# Altium PCB NFC_Lugg_Tag_PCB.PcbDoc
Units mm, origin at the board's own origin, x right, y up, seen from the top; angles counter-clockwise.
Board outline 100.08 x 50.16 mm, 2 copper layers (Top Layer, Bottom Layer), stack 1.671 mm thick; 42 components, 31 nets, 168 pads, 35 vias.
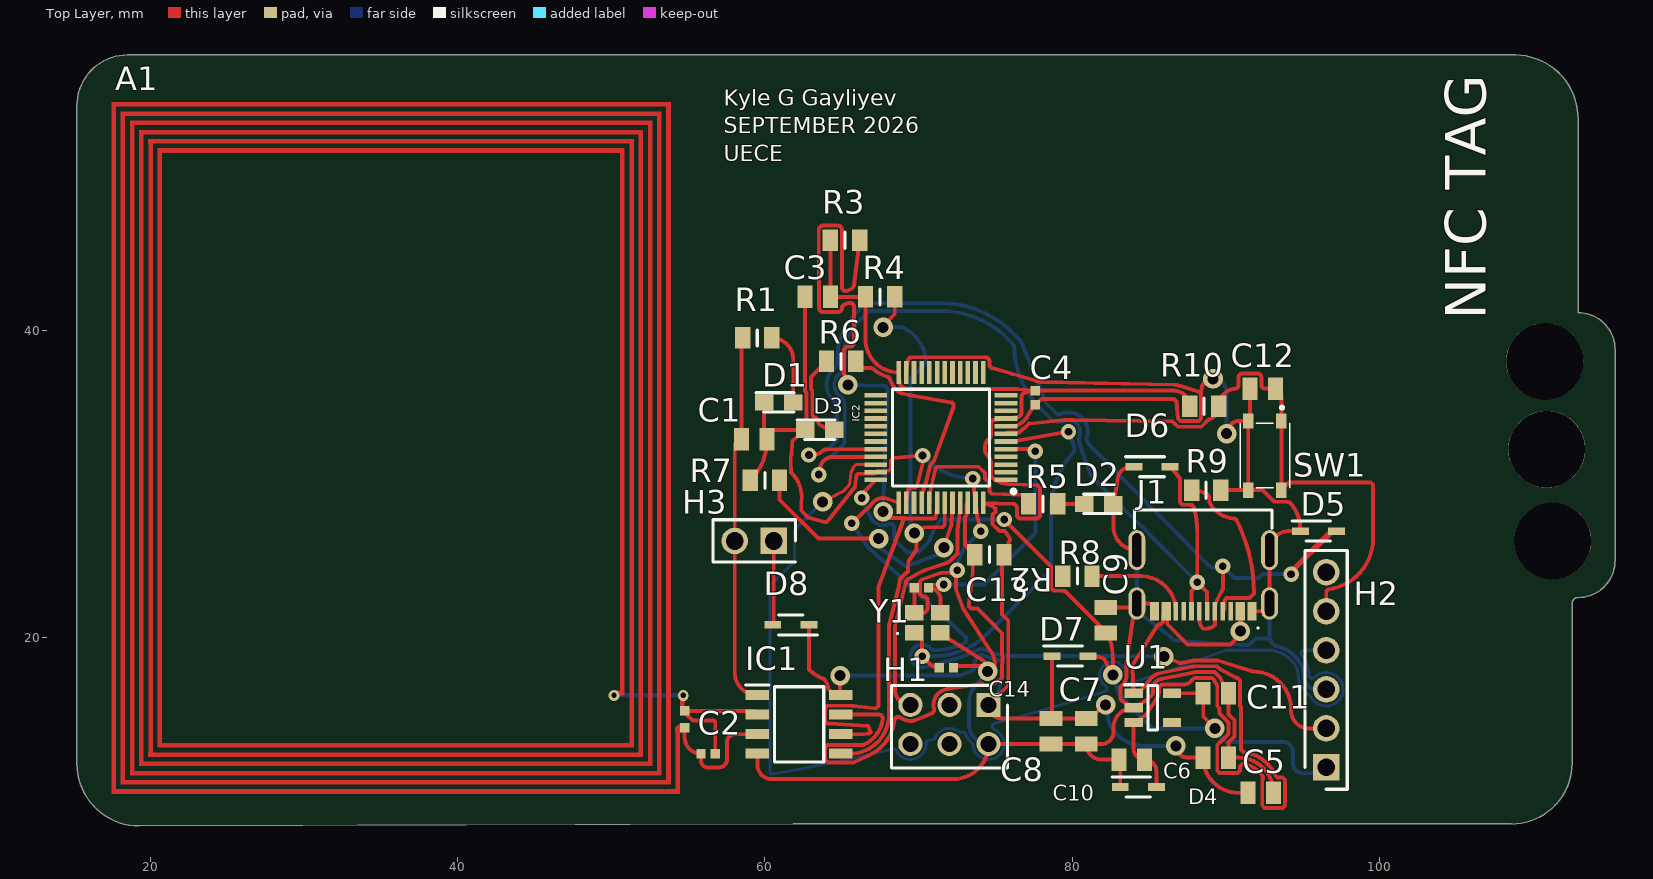
[diagram p0: Top Layer view]
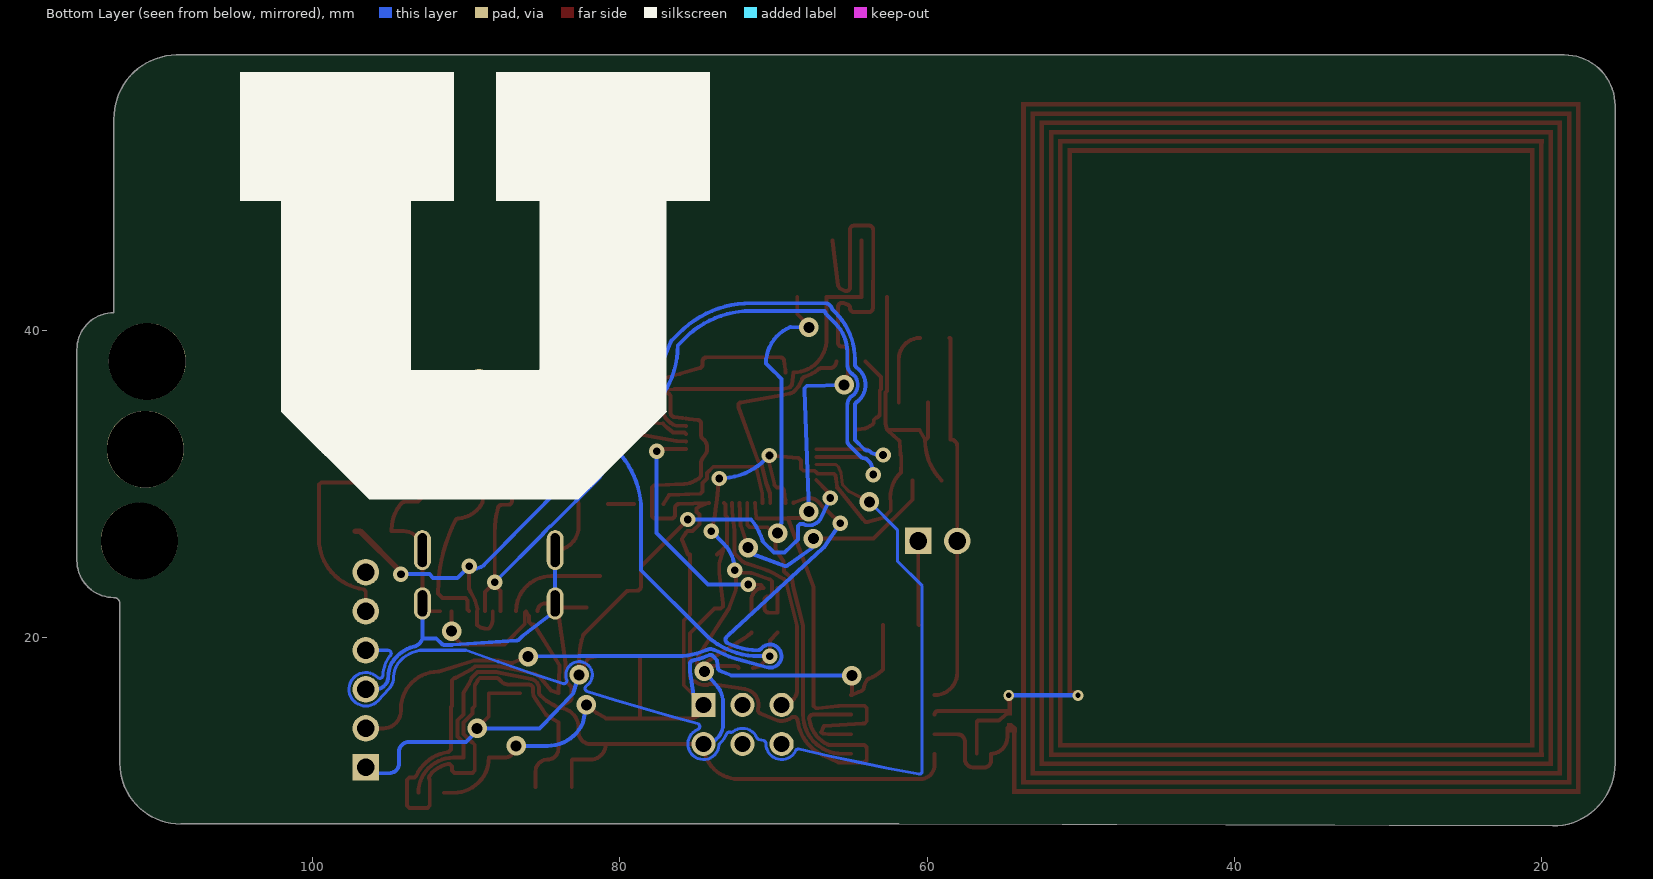
[diagram p1: Bottom Layer view, seen from below]
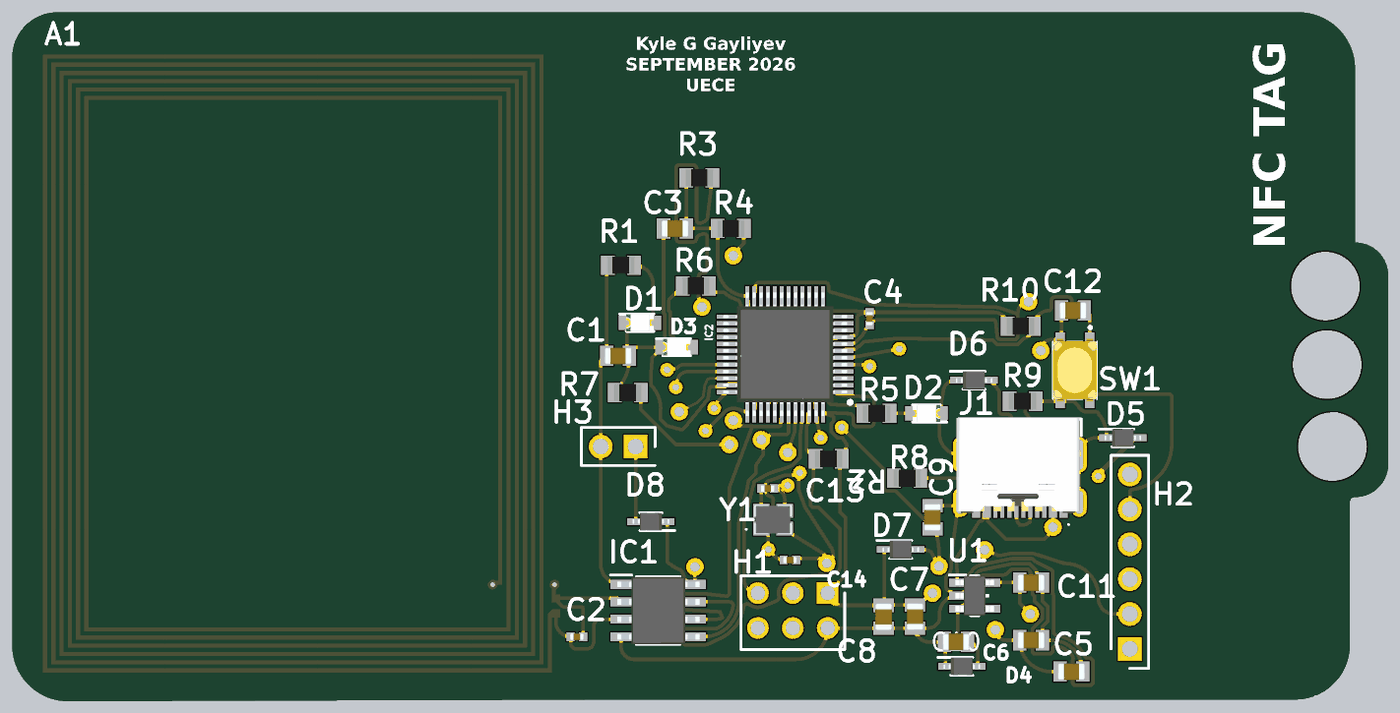
[diagram p2: 3D render of the assembled board from above, using the file's embedded part models]

## Layer stack, top to bottom
Top Solder: solder mask 0.0102, Solder Resist, Dk 3.5
Top Layer: signal copper 0.0356
Dielectric 1: dielectric 1.6, FR-4, Dk 4.8
Bottom Layer: signal copper 0.0356
Bottom Solder: solder mask 0.0102, Solder Resist, Dk 3.5

## Board outline
15.24,11.811 ccw(c19.304,11.811) 19.304,7.747 61.849,7.874 108.56,7.874 ccw(c108.56,11.836) 112.522,11.836 112.522,22.225 cw(c112.903,22.225) 112.903,22.606 ccw(c112.903,25.019) 115.316,25.019 115.316,38.735 ccw(c112.903,38.735) 112.903,41.148 112.903,53.721 ccw(c108.776,53.785) 108.839,57.912 18.542,57.912 ccw(c18.542,54.61) 15.24,54.61

## Design rules (kind name [scope] priority, off if disabled: settings)
Clearance [All] p1: gap=0.127 ignorepadtopadclearanceinfootprint=TRUE
ComponentClearance [All] p1: gap=0 collisioncheckmode=3 verticalgap=0.05 showdistances=FALSE
DiffPairsRouting [All] p1: maxlimit=0.254 minlimit=0.127 mostfreqgap=0.254 toplayer_minwidth=0.1 toplayer_maxwidth=0.5 toplayer_prefwidth=0.381 bottomlayer_minwidth=0.1 bottomlayer_maxwidth=0.5 bottomlayer_prefwidth=0.381 maxuncoupledlength=12.7
HoleSize [All] p1: absolutevalues=TRUE maxlimit=15 minlimit=0.025 maxpercent=80.000 minpercent=20.000
MinimumSolderMaskSliver [All] p1: minsoldermaskwidth=0
PolygonConnect [All] p1: connectstyle=Relief reliefconductorwidth=0.254 reliefentries=4 polygonreliefangle="90 Angle" airgapwidth=0.254
RoutingVias [All] p1: holewidth=0.35 width=0.7 viastyle="Through Hole" minholewidth=0.3 minwidth=0.6 maxholewidth=1 maxwidth=2
SilkToSilkClearance [All] p1: silktosilkclearance=0
SilkToSolderMaskClearance [IsPad] p1: minsilkscreentomaskgap=0 clearancetoexposedcopper=TRUE
SolderMaskExpansion [All] p1: expansion=0.102 istentingtop=FALSE
SupplyNets "Schematic Supply Nets_6" [InNet('GND')] p1: voltage=0.000
SupplyNets "Schematic Supply Nets_5" [InNet('+1.1')] p2: voltage=0.000
SupplyNets "Schematic Supply Nets_4" [InNet('+3.3')] p3: voltage=0.000
SupplyNets "Schematic Supply Nets_3" [InNet('V_IN')] p4: voltage=0.000
SupplyNets "Schematic Supply Nets_2" [InNet('+3.3_SB')] p5: voltage=0.000
SupplyNets "Schematic Supply Nets_1" [InNet('V_BUS')] p6: voltage=0.000
SupplyNets "Schematic Supply Nets" [InNet('V_SYS')] p7: voltage=0.000
Width [All] p1: maxlimit=2 minlimit=0.1 preferedwidth=0.254
24 further rules are at their usual default settings.

## Classes and differential pairs
component class NFC_Controller: A1 C1 C2 C3 C4 D1 H1 IC1 R1 R2 R3 R4
component class Microcontroller: C5 C6 C7 C8 C9 C10 C11 C12 C13 C14 D2 D3 D4 D5 D7 D8 H2 H3 IC2 J1 R5 R6 R7 R8 R9 R10 U1 Y1
differential pair USB_D: +USB_D_P -USB_D_N

## Components (designator, comment, footprint, x,y, rotation, side; value= is the part's Value field where it differs from the comment)
A1 "Antenna" "NFC Antenna 45 x 37" 54.483,37.338 r180 top net-tie
C1 "100n" CAP0805 59.309,32.893 r0 top
C2 "10p" CAP0402 56.309,12.446 r180 top
C3 "100n" CAP0805 63.441,42.164 r180 top
C4 "10p" CAP0402 77.597,35.608 r270 top
C5 "100n" CAP0805 92.27,9.906 r0 top
C6 "100n" CAP0805 89.34,12.192 r0 top
C7 "100n" CAP0805 80.899,13.911 r270 top
C8 "100n" CAP0805 78.613,13.902 r270 top
C9 "100n" CAP0805 82.169,21.141 r90 top
C10 "100n" CAP0805 83.879,12.065 r180 top
C11 "100n" CAP0805 89.34,16.383 r0 top
C12 "100n" CAP0805 92.388,36.195 r180 top
C13 "10p" CAP0402 70.183,23.241 r180 top
C14 "10p" CAP0402 71.803,18.034 r180 top
D1 "LED" LEDM2012X80N 60.899,35.306 r0 top
D2 "LED" LEDM2012X80N 81.727,28.702 r180 top
D3 "LED" LEDM2012X80N 63.566,33.528 r0 top
D4 "5V" SOD323 84.296,10.287 r0 top
D5 "5V" SOD323 96.012,26.924 r0 top
D6 "5V" SOD323 85.185,31.115 r0 top
D7 "1N5819" SOD323 79.851,18.796 r0 top
D8 "1N5819" SOD323 61.69,20.828 r180 top
H1 "Header" HEADER_2X3 74.549,15.621 r180 top
H2 "Header" Header_1X6 96.52,11.557 r90 top
H3 "Header" Header_1X2 60.579,26.289 r180 top
IC1 "ST25DV16KC-IE6S3" SOIC8 62.23,14.351 r0 top
IC2 "STM32L052C8T6" QFP50P900X900X160-48N 71.454,33.008 r180 top
J1 "USB C" "USB TYPE C 12 PIN" 88.519,24.892 r180 top
R1 "5.11k" RESC0805 59.502,39.497 r0 top
R2 "10k" RESC0805 74.61,25.4 r180 top
R3 "10k" RESC0805 65.212,45.847 r0 top
R4 "10k" RESC0805 67.498,42.164 r0 top
R5 "10k" RESC0805 78.105,28.702 r0 top
R6 "10k" RESC0805 64.958,37.973 r180 top
R7 "10k" RESC0805 60.005,30.226 r180 top
R8 "5.11k" RESC0805 80.33,24.003 r180 top
R9 "5.11k" RESC0805 88.712,29.591 r0 top
R10 "10k" RESC0805 88.58,35.052 r0 top
SW1 "Tactile Switch - 1" "Tactile Button 4.2mm x 3.2mm" 92.524,31.841 r270 top
U1 "TPS7A0333PDBVR" SOT23-5 85.237,15.433 r0 top
Y1 "ECS-120-10-36B2-CWY-TR" ECS1201036B2CWYTR 70.573,20.97 r0 top

## Footprints (in the part's own frame and the unit in brackets; to place one, negate y for a bottom-side part, rotate by r counter-clockwise, add the part's x,y. Pads: shape width x height; smd on the part's side, far side on the other; paste and mask are expansions set on the pad)
CAP0402 [mm]
  rect 0.6x0.62 smd: 1(-0.46,0) 2(0.46,0)
  body extent -0.5,-0.25 0.5,0.25, height 0.55
CAP0805 [mm]
  rect 0.97x1.47 smd: 1(-0.83,0) 2(0.83,0)
  body extent -1,-0.63 1,0.63, height 1.45
ECS1201036B2CWYTR [mm]
  rect 1.2x1 smd: 1(-0.85,-0.65) 2(0.85,-0.65) 3(0.85,0.65) 4(-0.85,0.65)
  silkscreen extent -2,-0.75 -1.9,-0.65, body extent -1.35,-1.05 1.35,1.05, height 0.7
Header_1X2 [mm]
  rect 1.725x1.725 hole 1.15: 1(0,0)
  round 1.725 hole 1.15: 2(2.54,0)
  silkscreen extent -1.42,-1.38 3.95,1.37
Header_1X6 [mm]
  rect 1.725x1.725 hole 1.15: 1(0,0)
  round 1.725 hole 1.15: 2(2.54,0) 3(5.08,0) 4(7.62,0) 5(10.16,0) 6(12.7,0)
  silkscreen extent -1.42,-1.37 14.1,1.37
HEADER_2X3 [mm]
  rect 1.575x1.575 hole 1.05: 1(0,0)
  round 1.575 hole 1.05: 2(0,2.54) 3(2.54,0) 4(2.54,2.54) 5(5.08,0) 6(5.08,2.54)
  silkscreen extent -1.23,-1.27 6.3,4.11
LEDM2012X80N [mm]
  rect 1.2x1.05 smd: 1(-0.95,0) 2(0.95,0)
  silkscreen extent -1.48,-0.63 1,0.63, body extent -1,-0.63 1,0.63, height 0.7
"NFC Antenna 45 x 37" [mm]
  rect 0.6x0.6 smd paste-2539.97 mask-2539.97: 1(-0.3,22.1) 2(-0.3,23.2)
  Top Layer region: 3.6,20.8 4.1,20.8 4.1,21.1 3.6,21.1
  Top Layer region: 1.2,-16.9 36.4,-16.9 36.4,-16.6 1.2,-16.6
  Top Layer region: 0.6,-17.5 37,-17.5 37,-17.2 0.6,-17.2
  Top Layer region: 35.8,-16.3 35.8,-16 1.8,-16 1.8,-16.3
  Top Layer region: 35.2,-15.7 35.2,-15.4 2.4,-15.4 2.4,-15.7
  Top Layer region: 34.6,-15.1 34.6,-14.8 3,-14.8 3,-15.1
  Top Layer region: 34,-14.5 34,-14.2 3.6,-14.2 3.6,-14.5
  Top Layer region: 0,27.2 37,27.2 37,27.5 0,27.5
  Top Layer region: 1.2,26.3 1.2,26 35.8,26 35.8,26.3
  Top Layer region: 0.6,26.6 36.4,26.6 36.4,26.9 0.6,26.9
  Top Layer region: 0,23.2 0.3,23.2 0.3,27.5 0,27.5
  Top Layer region: 3.6,-14.5 3.9,-14.5 3.9,21.1 3.6,21.1
  Top Layer region: 3,-15.1 3.3,-15.1 3.3,24.5 3,24.5
  Top Layer region: 34,24.5 33.7,24.5 33.7,-14.5 34,-14.5
  Top Layer region: 3,24.5 3,24.2 34,24.2 34,24.5
  Top Layer region: 2.4,-15.7 2.7,-15.7 2.7,25.1 2.4,25.1
  Top Layer region: 34.6,25.1 34.3,25.1 34.3,-15.1 34.6,-15.1
  Top Layer region: 2.4,25.1 2.4,24.8 34.6,24.8 34.6,25.1
  Top Layer region: 1.8,-16.3 2.1,-16.3 2.1,25.7 1.8,25.7
  Top Layer region: 35.2,25.7 34.9,25.7 34.9,-15.7 35.2,-15.7
  Top Layer region: 1.8,25.7 1.8,25.4 35.2,25.4 35.2,25.7
  Top Layer region: -0.3,21.1 0,21.1 0,22.4 -0.3,22.4
  Top Layer region: 36.1,-16.9 36.4,-16.9 36.4,26.9 36.1,26.9
  Top Layer region: 35.8,26.3 35.5,26.3 35.5,-16.3 35.8,-16.3
  Top Layer region: 1.2,-16.9 1.5,-16.9 1.5,26.3 1.2,26.3
  Top Layer region: 0.6,-17.5 0.9,-17.5 0.9,26.9 0.6,26.9
  Top Layer region: 36.7,-17.5 37,-17.5 37,27.5 36.7,27.5
  Top Layer region: -0.5,21.3 -0.3,21.5 0,21.5 0,21.1 -0.5,21.1
  Top Layer region: 4.1,21.3 3.9,21.1 3.9,20.8 4.3,20.8 4.3,21.3
  Top Layer region: 0.3,23.2 0,22.9 -0.3,22.9 -0.3,23.5 0.3,23.5
  Bottom Layer region: -0.4,20.95 4.5,20.95 4.5,21.25 -0.4,21.25
QFP50P900X900X160-48N [mm]
  rect 1.475x0.3 smd: 1(-4.238,2.75) 2(-4.238,2.25) 3(-4.238,1.75) 4(-4.238,1.25) 5(-4.238,0.75) 6(-4.238,0.25) 7(-4.238,-0.25) 8(-4.238,-0.75) 9(-4.238,-1.25) 10(-4.238,-1.75) 11(-4.238,-2.25) 12(-4.238,-2.75) 25(4.238,-2.75) 26(4.238,-2.25) 27(4.238,-1.75) 28(4.238,-1.25) 29(4.238,-0.75) 30(4.238,-0.25) 31(4.238,0.25) 32(4.238,0.75) 33(4.238,1.25) 34(4.238,1.75) 35(4.238,2.25) 36(4.238,2.75)
  rect 0.3x1.475 smd: 13(-2.75,-4.238) 14(-2.25,-4.238) 15(-1.75,-4.238) 16(-1.25,-4.238) 17(-0.75,-4.238) 18(-0.25,-4.238) 19(0.25,-4.238) 20(0.75,-4.238) 21(1.25,-4.238) 22(1.75,-4.238) 23(2.25,-4.238) 24(2.75,-4.238) 37(2.75,4.238) 38(2.25,4.238) 39(1.75,4.238) 40(1.25,4.238) 41(0.75,4.238) 42(0.25,4.238) 43(-0.25,4.238) 44(-0.75,4.238) 45(-1.25,4.238) 46(-1.75,4.238) 47(-2.25,4.238) 48(-2.75,4.238)
  silkscreen extent -4.85,-3.15 3.15,3.62, body extent -4.5,-4.5 4.5,4.5, height 1.6
RESC0805 [mm]
  rect 1x1.4 smd: 1(-0.95,0) 2(0.95,0)
  silkscreen extent 0,-0.53 0,0.53, body extent -1,-0.63 1,0.63, height 0.5
SOD323 [mm]
  rect 1.1x0.5 smd: 1(-1.175,0) 2(1.175,0)
  silkscreen extent -1.73,-0.65 0.8,0.65, body extent -1.33,-0.65 1.33,0.65, height 1.1
SOIC8 [mm]
  rect 1.525x0.65 smd: 1(-2.712,1.905) 2(-2.712,0.635) 3(-2.712,-0.635) 4(-2.712,-1.905) 5(2.712,-1.905) 6(2.712,-0.635) 7(2.712,0.635) 8(2.712,1.905)
  silkscreen extent -3.47,-2.45 1.6,2.58, body extent -3,-2.45 3,2.45, height 1.75
SOT23-5 [mm]
  rect 1.2x0.6 smd: 1(-1.25,0.95) 2(-1.25,0) 3(-1.25,-0.95) 4(1.25,-0.95) 5(1.25,0.95)
  silkscreen extent -1.85,-1.45 0.3,1.5, body extent -1.4,-1.45 1.4,1.45, height 1.2
"Tactile Button 4.2mm x 3.2mm" [mm]
  rect 1x0.7 smd: 1(-2.25,1.075) 2(2.25,1.075) 3(-2.25,-1.075) 4(2.25,-1.075)
  silkscreen extent -3.22,-1.6 2.1,1.61, body extent -2.3,-1.6 2.3,1.6, height 2.6
"USB TYPE C 12 PIN" [mm]
  oval 1.1x2.6 hole 0.6 slot 2.2 at 90 deg: 1(-4.32,-0.8) 16(4.32,-0.8)
  oval 1.1x2.1 hole 0.6 slot 1.7 at 90 deg: 2(-4.318,2.667) 15(4.318,2.667)
  rect 0.6x1.2 smd: 3(3.175,3.175) 4(2.413,3.175) 13(-2.413,3.175) 14(-3.175,3.175)
  rect 0.3x1.2 smd: 5(1.778,3.175) 6(1.27,3.175) 7(0.762,3.175) 8(0.254,3.175) 9(-0.254,3.175) 10(-0.762,3.175) 11(-1.27,3.175) 12(-1.778,3.175)
  silkscreen extent -4.47,-3.4 4.47,4.32, body extent -4.34,-3.47 4.6,3.43, height 3.26

## Part data
A1: library part "Antenna - Dual Ended 2", "Antenna - Dual Ended"
C1 C3 C12: library part "Capacitor - Non Polarized", "Non Polarized Capacitor"
C2 C4 C13 C14: library part "Capacitor - Non Polarized_1", "Non Polarized Capacitor"
C5 C6 C7 C8 C9 C10 C11: library part "Capacitor - Non Polarized_2", "Non Polarized Capacitor"
D1 D2 D3: "General Purpose LED", ComponentLink1Description=Datasheet, ComponentLink1URL=https://www.smc-diodes.com/propdf/1N4148W%20N0571%20REV.E.pdf
D4 D5 D6: library part "TVS Diode", "TVS Diode"
D7 D8: "1N5819 Schottkey Diode"
H1: library part "6-Pin Header (3x2)", "6-Pin 2 Row Header"
H2: library part "6-Pin Header", "6-Pin Header"
H3: library part "2-Pin Header", "2-Pin Header"
IC1: "Integrated Circuit", Manufacturer_Name=STMicroelectronics, Mouser Part Number=511-ST25DV16KC-IE6S3, Arrow Part Number=ST25DV16KC-IE6S3, Arrow Price/Stock=https://www.arrow.com/en/products/st25dv16kc-ie6s3/stmicroelectronics?region=nac, Datasheet Link=https://www.st.com/resource/en/datasheet/st25dv04kc.pdf, Height=1.75mm, Manufacturer_Part_Number=ST25DV16KC-IE6S3, Mouser Price/Stock=https://www.mouser.co.uk/ProductDetail/STMicroelectronics/ST25DV16KC-IE6S3?qs=QNEnbhJQKvbFHl9iSDOFGA%3D%3D
IC2: "Integrated Circuit", Manufacturer_Name=STMicroelectronics, Mouser Part Number=511-STM32L052C8T6, Arrow Part Number=STM32L052C8T6, Arrow Price/Stock=https://www.arrow.com/en/products/stm32l052c8t6/stmicroelectronics?utm_currency=USD&region=nac, Datasheet Link=http://www.st.com/content/ccc/resource/technical/document/datasheet/dc/d6/6d/24/86/2a/40/d3/DM00108217.pdf/files/DM00108217.pdf/jcr:content/translations/en.DM00108217.pdf, Height=1.6mm, Manufacturer_Part_Number=STM32L052C8T6, Mouser Price/Stock=https://www.mouser.co.uk/ProductDetail/STMicroelectronics/STM32L052C8T6?qs=DqCdCwOw4%2F6IOKsu3MZAIw%3D%3D
J1: library part "USB Type C Connector 12 Pin"
R1 R8 R9: library part Resistor_1, "Resistor"
R2 R3 R4 R7: library part Resistor_2, "Resistor"
R5 R6 R10: library part Resistor, "Resistor"
SW1: "Tactile Pushbutton - Contact Pad"
U1: "TPS7A03 Nanopower IQ, 200-nA, 200-mA, Low-Dropout Voltage Regulator With Fast / Transient Response", Manufacturer_Name="Texas Instruments", Mouser Part Number=595-TPS7A0333PDBVR, Arrow Part Number=TPS7A0333PDBVR, Arrow Price/Stock=https://www.arrow.com/en/products/tps7a0333pdbvr/texas-instruments?region=nac, Datasheet Link=https://www.ti.com/lit/ds/symlink/tps7a03.pdf?HQS=dis-dk-null-digikeymode-dsf-pf-null-wwe&ts=1622188030827&ref_url=https%253A%252F%252Fwww.digikey.in%252F, Height=1.45mm, Manufacturer_Part_Number=TPS7A0333PDBVR, Mouser Price/Stock=https://www.mouser.co.uk/ProductDetail/Texas-Instruments/TPS7A0333PDBVR?qs=OlC7AqGiEDkyaMBNBZB82A%3D%3D
Y1: "Crystal or Oscillator", Manufacturer_Name=ECS, Mouser Part Number=520-120-10-36B2CWYTR, Arrow Part Number=ECS-120-10-36B2-CWY-TR, Arrow Price/Stock=https://www.arrow.com/en/products/ecs-120-10-36b2-cwy-tr/ecs-international.html?utm_currency=USD&region=europe, Datasheet Link=https://ecsxtal.com/store/pdf/ECX-2236B2.pdf, Height=0.6mm, Manufacturer_Part_Number=ECS-120-10-36B2-CWY-TR, Mouser Price/Stock=https://www.mouser.co.uk/ProductDetail/ECS/ECS-120-10-36B2-CWY-TR?qs=QNEnbhJQKva%2FwIO%2FvYs2yg%3D%3D

## Free pads (board coordinates)
  round 5 hole 5 unplated: 4(110.744,37.973) 4(110.871,32.258) 4(111.252,26.289)

## Via types
v1: diameter 1.27, hole 0.711, Top Layer to Bottom Layer, 17 vias
v2: diameter 1, hole 0.5, Top Layer to Bottom Layer, 16 vias
v3: diameter 0.7, hole 0.35, Top Layer to Bottom Layer, 2 vias

## Nets (pads, with @x,y where several pads share a name; then routed paths per layer and width w, separated by ;. In a path a pad name is that pad's centre, name@x,y a point inside that pad or via, vN(x,y) a via of type N, cw(c..) or ccw(c..) an arc to the next point about the centre after c; other vN are vias at no path point)
+3.3_USB: C9.1 C11.1 D7.2 H2.1 IC2.36 U1.5 | length 52.4
  Top Layer w0.254: v2(66.294,29.083) cw(c66.905,29.083) 66.473,29.515 IC2.36 ; v2(75.565,27.686) 78.552,24.699 cw(c78.372,24.52) 78.626,24.52 78.626,23.303 ccw(c78.88,23.303) 78.88,23.049 79.407,23.049 cw(c79.407,22.795) 79.586,22.975 82.317,20.244 cw(c82.137,20.064) 82.378,20.147 cw(c77.641,18.534) 82.645,18.534 v1(82.645,17.576) 82.067,18.611 ccw(c81.407,17.526) 81.407,18.796 D7.2 ; U1.5 C11.1 88.519,16.374 88.519,14.859 v1(89.281,14.097)
  Bottom Layer w0.254: v2(66.294,29.083) 66.886,27.817 ccw(c67.691,28.194) 68.056,27.383 ; 68.057,27.384 cw(c68.16,27.152) 68.413,27.132 68.408,27.127 68.408,27.011 68.408,26.396 68.843,25.962 69.277,25.527 69.892,25.527 69.897,25.527 69.955,25.527 70.668,26.24 ccw(c70.474,26.404) 70.716,26.326 cw(c74.661,25.076) 71.45,27.686 v2(75.565,27.686) ; v1(82.645,17.576) 83.003,16.441 83.008,16.425 cw(c82.766,16.349) 83.009,16.423 ; 83.009,16.422 83.02,16.385 85.068,14.246 85.217,14.097 v1(89.281,14.097) 89.281,13.935 90.008,13.208 93.726,13.208 cw(c93.726,12.573) 94.361,12.573 94.361,11.811 ccw(c94.996,11.811) 94.996,11.176 96.139,11.176 ccw(c96.139,11.557) H2.1
GND: C1.2 C3.2 C4.2 C5.2 C6.2 C7.2 C8.2 C9.2 C10.2 C11.2 C12.2 C13.2 C14.1 D1.1 D2.1 D3.1 D4.1 D5.1 D6.1 H1.2 H2.3 IC1.4 IC2.8 IC2.23 IC2.35 IC2.38 IC2.47 J1.1 J1.2 J1.3 J1.14 J1.15 J1.16 R7.2 R9.2 SW1.3 SW1.4 U1.2 Y1.2 Y1.4 | length 229.1
  Top Layer w0.254: R7.2 ccw(c56.438,32.843) 60.139,32.843 C1.2 ; IC1.4 59.518,11.729 ccw(c60.452,11.729) 60.452,10.795 72.263,10.795 ccw(c72.263,13.081) H1.2 78.613,13.081 C8.2 C7.2@80.899,13.072 ; D1.1 59.949,33.083 ccw(c60.139,33.083) C1.2 ; D3.1@62.611,33.529 62.703,33.926 62.703,35.936 62.611,36.028 C3.2 ; IC2.38 69.227,28.951 69.302,29.54 cw(c69.554,29.508) 69.554,29.762 69.767,29.762 ; IC2.23 69.227,37.427 69.302,38.016 cw(c69.554,37.984) 69.554,38.238 74.354,38.237 cw(c74.354,37.984) 74.608,37.984 74.608,37.783 ccw(c74.862,37.783) 74.791,37.539 76.085,37.163 cw(c75.499,35.148) 76.088,37.161 77.913,36.631 ccw(c77.984,36.875) 77.979,36.621 86.64,36.449 cw(c86.614,35.052) 87.057,36.377 88.21,35.993 cw(c88.13,35.752) 88.384,35.752 ; C13.2 Y1.4 70.315,21.62 ccw(c70.315,21.874) 70.569,21.874 70.569,22.12 cw(c70.823,22.12) 70.57,22.146 70.596,22.397 ccw(c70.343,22.423) 70.343,22.677 cw(c70.343,22.931) 70.089,22.931 70.089,23.656 70.205,23.772 71.446,24.216 71.544,24.218 72.116,24.218 ccw(c72.116,24.785) v2(72.517,24.384) 72.438,24.305 72.438,23.232 72.439,23.219 72.453,23.078 72.903,21.878 74.871,18.822 74.958,18.413 cw(c74.709,18.36) 74.885,18.176 cw(c74.708,18.359) 74.884,18.175 v1(74.485,17.797) v1@74.485,18.161 ; 69.768,29.762 69.917,29.91 70.31,31.477 70.31,31.687 v2(70.261,31.847) ; v2@70.261,31.75 v2(70.261,31.847) ; Y1.2 71.896,19.947 74.184,18.526 74.549,18.161 v1@74.485,18.161 ; C14.1 cw(c72.57,17.727) 72.57,18.161 v1@74.485,18.161 ; v2(73.533,30.353) 73.681,28.983 IC2.47 73.727,28.589 73.802,28 ccw(c74.054,28.032) 73.806,27.977 v2(74.041,26.924) ; IC2.8 76.303,33.781 76.535,33.854 76.656,33.975 76.695,33.975 77.016,34.296 77.414,34.975 C4.2 77.78,35.321 77.938,35.454 cw(c78.102,35.26) 78.102,35.514 86.622,35.514 86.771,35.365 86.876,34.247 87.025,34.098 88.235,34.098 88.384,34.247 88.384,35.752 ; C9.2 83.947,21.971 ccw(c83.947,22.225) J1.15@84.04,21.989 ; D4.1 83.121,11.993 ccw(c83.049,11.993) C10.2 81.915,12.065 cw(c81.915,13.081) C7.2@80.899,13.072 ; 83.528,17.416 cw(c82.651,17.557) 83.224,16.877 ccw(c83.387,16.683) 83.133,16.683 83.133,16.083 ccw(c83.387,16.083) 83.258,15.864 83.695,15.606 U1.2 ; 83.528,17.416 83.54,17.486 83.54,17.925 83.537,18.033 83.537,18.356 84.036,21.959 J1.15@84.04,21.989 ; D6.1@84.001,31.077 ccw(c83.804,30.239) 82.943,30.239 D2.1 82.677,27.214 ccw(c84.199,27.214) J1.16 ; J1.3 ccw(c84.836,21.717) 84.836,22.225 J1.15 ; v1(89.154,36.83) ccw(c89.154,36.06) 88.384,36.06 88.384,35.752 ; R9.2 SW1.4 ; v1(90.043,33.274) cw(c90.86,33.274) 90.86,34.091 SW1.3 ; C12.2 91.558,34.2 cw(c91.449,34.2) SW1.3 ; J1.14 92.329,21.717 ccw(c92.329,22.225) J1.2 92.837,25.692 J1.1 cw(c94.071,25.692) 94.071,26.924 D5.1 94.837,27.051 ccw(c92.297,27.051) 94.182,28.754 ccw(c93.994,28.583) 93.994,28.837 93.949,28.837 93.249,28.837 cw(c93.249,29.091) 93.068,28.913 92.478,29.515 ccw(c92.297,29.337) 92.297,29.591 SW1.4 ; C5.2 ccw(c90.814,9.906) 90.814,12.192 C6.2 90.17,13.19 90.551,13.571 90.551,14.623 90.17,15.004 C11.2 89.812,16.991 89.63,17.381 89.258,17.753 88.025,17.753 ccw(c88.025,17.118) 87.898,17.74 85.762,17.306 ccw(c85.887,16.683) 85.252,16.683 85.252,16.429 cw(c84.998,16.429) 85.162,16.234 84.751,15.889 cw(c84.587,16.083) 84.718,15.865 84.287,15.606 U1.2 ; C1.2 60.497,33.501 62.02,33.511 62.143,33.511 62.611,33.528 D3.1 62.164,33.13 61.853,32.856 61.78,32.783 61.722,31.869 61.684,31.832 61.684,31.056 61.709,31.031 61.709,30.747 cw(c60.036,29.074) 62.402,29.115 cw(c60.036,29.074) 62.402,29.112 cw(c62.148,29.11) 62.402,29.11 62.402,29.098 62.397,29.047 62.365,28.887 62.365,28.263 62.807,27.821 63.886,27.522 64.006,27.527 64.155,27.676 65.851,29.778 65.953,30.566 65.975,30.588 66.049,30.662 67.122,30.662 67.195,30.735 IC2.35 67.241,30.781 67.32,30.854 68.059,30.854 68.208,31.003 68.208,31.512 68.371,31.676 v2(70.261,31.847) ; C7.2@80.899,13.072 C7.2 81.915,13.081 ccw(c81.915,13.843) 82.677,13.843 82.677,14.123 cw(c83.987,14.123) U1.2 ; J1.15@84.04,21.989 ccw(c83.947,22.225) J1.15 ; J1.15@84.04,21.989 84.052,22.076 J1.15 ; SW1.4 SW1.3
  Bottom Layer w0.254: v2(70.261,31.847) 70.498,31.61 ccw(c73.533,34.645) v2(73.533,30.353) ; v2(72.517,24.384) cw(c74.97,24.384) 73.235,26.118 v2(74.041,26.924) ; v1(74.485,17.797) 73.733,16.935 cw(c73.543,17.103) 73.731,16.933 ccw(c75.057,15.748) 73.279,15.748 73.279,14.351 ccw(c74.549,14.351) H1.2 ; J1.16 84.199,22.225 J1.15 84.201,21.725 86.36,20.066 86.54,19.886 ; 86.54,19.886 ccw(c86.719,20.067) 86.541,19.885 ccw(c86.719,20.067) 86.598,19.843 ccw(c86.719,20.067) 86.601,19.842 ccw(c86.719,20.067) 86.702,19.813 90.873,19.533 ccw(c90.932,20.42) 90.932,19.531 91.423,19.532 ccw(c91.423,19.786) 91.602,19.605 91.937,19.941 92.846,19.941 ; v1(89.154,36.83) cw(c89.154,35.941) 90.043,35.941 v1(90.043,33.274) ; J1.2 92.837,20.212 cw(c92.583,20.212) 92.835,20.181 ccw(c93.508,20.09) 92.846,19.941 ; 95.059,17.462 ccw(c95.885,17.463) 95.885,16.637 H2.3 ; 95.059,17.463 ccw(c93.27,17.471) 94.678,18.574 ccw(c92.779,17.085) 93.345,19.431 cw(c93.508,20.09) 92.846,19.941
I2C1_SCL: H1.3
I2C1_SDA: H1.4
"LED INDC0": IC2.41 R5.1 | length 9.9
  Top Layer w0.254: IC2.41 70.727,29.381 71.087,30.919 71.104,30.989 71.229,31.115 73.914,31.115 74.319,30.71 74.319,30.345 74.608,30.056 74.608,29.951 74.608,29.508 74.682,29.433 74.757,29.359 76.782,29.275 R5.1
"LED INDC1": IC2.40 R6.1 | length 14.2
  Top Layer w0.254: R6.1 ccw(c66.35,37.973) 66.35,37.531 66.895,37.531 ; 66.896,37.531 cw(c66.894,37.277) 67.054,37.474 67.104,37.433 ccw(c68.704,39.402) 67.93,36.986 67.98,36.97 cw(c67.903,36.728) 68.134,36.833 68.135,36.831 68.299,36.457 68.321,36.406 ccw(c68.554,36.508) 68.374,36.329 ; 68.375,36.328 cw(c68.196,36.149) 68.39,36.312 68.568,36.1 ccw(c69.054,36.508) 68.916,35.889 ccw(c69,36.26) 68.918,35.888 ; 68.919,35.888 69.34,35.796 ccw(c69.422,36.168) 69.341,35.795 ccw(c69.476,36.416) 69.365,35.791 72.11,35.304 72.189,35.29 72.273,35.205 72.273,34.995 71.015,31.535 70.733,31.158 70.483,30.09 70.227,29.381 IC2.40
NetA1_1: A1.1 C2.1 IC1.2 | length 9.3
  Top Layer w0.254: C2.1 56.769,14.478 ccw(c56.642,14.478) 56.642,14.605 55.416,14.605 cw(c55.416,14.859) 55.246,14.67 54.807,15.065 A1.1 59.266,15.238 cw(c59.266,14.986) IC1.2
NetA1_2: A1.2 C2.2 IC1.3 | length 8.4
  Top Layer w0.254: A1.2 54.783,13.512 ccw(c55.849,13.512) C2.2 55.849,11.969 ccw(c56.261,11.969) 56.261,11.557 57.023,11.557 ccw(c57.023,12.065) 57.531,12.065 57.531,13.208 cw(c58.039,13.208) 58.039,13.716 IC1.3
NetD1_2: D1.2 R1.2 | length 5
  Top Layer w0.254: R1.2 cw(c60.452,38.1) 61.849,38.1 D1.2
NetD2_2: D2.2 R5.2 | length 1.7
  Top Layer w0.254: R5.2 D2.2
NetD3_2: D3.2 R6.2 | length 5.8
  Top Layer w0.254: R6.2 62.992,36.957 62.992,36.186 63.084,36.094 63.084,34.531 ccw(c64.516,35.052) 63.102,34.483 ccw(c64.516,35.052) 63.111,34.461 63.112,34.46 ccw(c63.345,34.56) 63.321,34.307 63.47,34.158 63.47,33.954 63.554,33.87 ccw(c64.516,35.052) 64.043,33.603 D3.2
NetD8_2: D8.2 H3.1 | length 5.5
  Top Layer w0.254: D8.2 ccw(c60.515,20.892) 60.579,20.892 H3.1
NetH1_5: H1.5 IC2.45 | length 15.9
  Top Layer w0.254: H1.5 cw(c69.469,16.637) 68.453,16.637 68.453,20.701 69.132,23.435 69.146,23.491 69.169,23.517 69.169,23.656 69.318,23.805 70.001,24.189 cw(c71.57,21.396) 70.587,24.445 ; 70.588,24.445 71.847,24.851 71.876,24.871 72.009,24.96 72.53,25.481 72.53,26.967 72.681,28.159 IC2.45
NetIC1_5: IC1.5 IC2.43 R4.2 | length 38.7
  Top Layer w0.254: IC1.5 65.532,12.446 ccw(c65.532,14.986) 68.072,14.986 68.072,20.701 cw(c68.453,20.701) 68.083,20.793 68.684,23.212 68.788,23.814 68.878,23.904 69.138,24.164 69.176,24.18 69.308,24.312 69.327,24.932 69.852,25.705 69.871,26.549 69.871,26.649 v1(69.723,26.797) 69.998,26.797 70.379,27.178 71.555,27.178 71.63,27.252 71.704,27.327 IC2.43 ; v1(67.688,40.186) 67.688,40.288 68.448,41.048 68.448,41.143 R4.2
  Bottom Layer w0.25: v1(69.723,26.797) 69.528,26.992 69.528,27.395 69.469,27.453 69.469,36.83 69.965,37.326
  Bottom Layer w0.254: v1(67.688,40.186) 68.882,40.207 cw(c67.945,37.846) 70.485,37.846 69.965,37.326
NetIC1_6: IC1.6 IC2.42 R3.2 | length 60.6
  Top Layer w0.254: IC1.6 66.421,13.716 66.759,13.757 66.761,13.758 66.891,13.839 66.892,13.841 66.712,14.257 64.179,14.407 64.172,14.407 64.074,14.407 63.926,14.556 63.926,15.416 64.074,15.565 65.704,15.565 65.734,15.565 ccw(c65.792,15.812) 65.761,15.56 65.762,15.56 67.098,15.406 67.113,15.404 67.233,15.404 67.381,15.553 67.381,23.261 69.057,27.753 70.975,27.753 ccw(c70.975,27.958) 71.12,27.813 71.181,28.508 IC2.42 ; v1(65.399,36.445) 65.154,37.168 65.154,38.673 cw(c65.408,38.673) 65.408,38.927 65.54,38.927 ccw(c65.54,39.181) 65.794,39.181 65.794,41.529 ccw(c65.54,41.529) 65.453,41.768 65.177,41.668 ccw(c65.264,41.429) 65.01,41.429 cw(c64.756,41.429) 64.756,41.175 63.786,41.175 cw(c63.786,41.429) 63.532,41.428 63.508,45.145 cw(c63.762,45.147) 63.508,45.147 63.508,46.547 cw(c63.762,46.547) 63.762,46.801 64.762,46.801 cw(c64.762,46.547) 65.016,46.547 65.016,45.147 cw(c64.762,45.147) 65.013,45.108 ccw(c65.264,45.069) 65.01,45.069 65.01,42.799 ccw(c65.264,42.799) 65.369,42.568 65.649,42.695 65.796,42.895 66.091,45.274 R3.2 ; v1(67.691,28.194) 68.107,27.778 69.057,27.779
  Bottom Layer w0.254: v1(65.399,36.445) 67.831,36.357 67.901,36.286 67.976,36.212 67.976,36.102 v1(67.691,28.194)
NetIC1_7: IC1.7 IC2.46 R2.2 | length 36.1
  Top Layer w0.254: IC1.7 67.421,14.986 cw(c67.42,14.732) 67.672,14.699 cw(c65.532,14.986) 66.49,13.051 cw(c66.378,13.279) 66.378,13.025 65.705,13.025 64.18,13.025 ccw(c64.18,12.771) 63.926,12.771 63.926,12.121 ccw(c64.18,12.121) 64.18,11.867 65.705,11.867 ccw(c65.705,12.121) 65.812,11.891 66.766,12.338 ccw(c65.532,14.986) 68.431,14.625 cw(c68.682,14.592) 68.836,14.794 ccw(c69.469,15.621) 69.867,14.659 70.851,15.066 ccw(c70.754,15.301) 71.008,15.301 ccw(c70.754,15.301) 71,15.363 cw(c72.009,15.621) 71.852,16.651 74.03,16.984 cw(c74.069,16.733) 74.161,16.969 ccw(c74.485,17.797) 75.045,17.106 cw(c75.204,16.908) 75.145,17.155 ccw(c75.057,17.526) 75.438,17.522 75.438,18.139 cw(c76.073,18.139) 75.439,18.168 ; 73.025,27.843 73.025,26.035 73.287,25.773 R2.2 ; 73.025,27.844 73.108,27.927 73.108,28.674 IC2.46 ; R2.2@73.284,25.654 73.525,24.827 73.525,24.199 73.284,22.236 73.284,22.036 73.433,21.887 73.538,21.887 73.835,21.887 74.587,21.135 75.438,20.284 75.438,19.131 75.451,18.463 cw(c74.562,18.445) 75.45,18.402 75.439,18.169
NetIC2_44: IC2.44 R7.1 | length 17.3
  Top Layer w0.254: R7.1 60.955,28.97 63.485,26.44 v1(67.402,26.44) ; v1(71.641,25.849) 72.129,27.299 72.14,27.333 72.181,28.159 IC2.44
  Bottom Layer w0.254: v1(67.402,26.44) 67.502,25.842 67.574,25.77 69.068,24.704 69.134,24.657 69.215,24.657 69.261,24.657 71.355,25.439 71.427,25.511 71.596,25.883 71.63,25.849 v1(71.641,25.849)
NetJ1_5: J1.5 R8.1 | length 6.8
  Top Layer w0.254: R8.1 84.455,24.003 cw(c84.455,21.717) 86.567,22.593 86.641,22.414 cw(c86.406,22.317) 86.655,22.368 86.694,22.179 cw(c84.455,21.717) 86.718,22.04 J1.5
NetJ1_11: J1.11 R9.1 | length 11.6
  Top Layer w0.254: R9.1 88.135,29.556 cw(c87.762,27.564) 88.783,29.315 cw(c88.654,29.096) 88.908,29.097 88.908,28.891 ccw(c89.162,28.891) 88.937,28.774 ccw(c90.625,29.654) 90.485,27.755 ; J1.11 89.812,21.736 89.819,21.742 89.893,21.817 89.893,22.422 90.042,22.571 91.524,22.571 91.82,22.867 91.82,22.972 ccw(c91.566,22.972) 91.82,22.974 ccw(c81.26,22.868) 90.693,27.617 ccw(c90.466,27.502) 90.486,27.755
NFC_GPO: H1.6
NRST: C12.1 H2.5 IC2.7 R10.2 SW1.1 SW1.2 | length 43.6
  Top Layer w0.254: IC2.7 75.788,33.354 76.535,33.354 76.654,33.473 76.693,33.473 76.814,33.594 76.853,33.594 77.103,33.845 77.175,33.917 79.444,34.155 80.068,34.155 86.532,34.052 86.555,34.029 86.867,33.717 88.393,33.717 88.765,34.089 cw(c88.977,33.949) 88.823,34.151 88.84,34.164 88.858,34.174 cw(c88.977,33.949) 88.899,34.191 ccw(c88.627,35.052) 89.325,34.479 R10.2 cw(c90.673,35.052) 90.673,36.195 90.743,36.263 ccw(c90.565,36.445) 90.819,36.444 90.819,36.93 cw(c91.073,36.93) 91.073,37.184 92.043,37.184 cw(c92.043,36.93) 92.297,36.93 92.297,36.449 ccw(c92.551,36.449) 92.551,36.195 C12.1 cw(c93.218,35.814) 93.599,35.814 SW1.1 SW1.2@93.599,29.741 ; SW1.2 SW1.2@93.599,29.741 ; H2.5 96.524,23.017 96.598,23.091 96.657,23.149 ccw(c96.25,26.441) 99.568,26.43 99.568,29.95 99.419,30.099 94.107,30.099 93.972,29.964 93.822,29.964 SW1.2@93.599,29.741
SYS_SWCLK: H2.2 IC2.37 | length 49
  Top Layer w0.254: v2(65.659,27.432) 65.79,27.563 cw(c68.704,24.649) 65.867,27.638 66.813,28.536 ccw(c66.294,29.083) 66.875,28.602 67.006,28.761 cw(c67.691,28.194) 67.999,29.028 68.681,28.778 IC2.37 ; v1(85.962,18.77) 85.962,18.779 85.979,18.796 86.959,18.353 87.089,18.353 87.746,18.487 cw(c88.025,17.118) 88.025,18.515 89.416,18.515 cw(c89.416,18.134) 89.532,18.497 91.744,17.792 ccw(c91.821,18.034) 91.821,17.78 cw(c91.821,15.367) 94.234,15.367 94.234,15.24 ccw(c95.377,15.24) 95.377,14.097 H2.2
  Bottom Layer w0.254: v2(65.659,27.432) 66.665,25.942 ccw(c67.402,26.44) 66.801,25.785 72.928,20.162 cw(c72.756,19.976) 72.936,20.155 73.041,20.05 cw(c72.862,19.87) 72.973,19.642 cw(c70.952,23.8) 71.015,19.177 cw(c71.013,19.431) 70.817,19.27 ccw(c70.231,18.796) 70.432,18.069 72.387,18.61 ccw(c70.952,23.8) 73.16,18.888 73.848,19.198 cw(c74.109,18.619) 74.366,19.199 ccw(c76.394,23.773) 75.913,18.793 ccw(c75.936,19.046) 75.936,18.792 82.645,18.792 cw(c82.645,17.576) 82.655,18.792 v1(85.962,18.77)
SYS_SWDIO: H2.4 IC2.34 | length 79.3
  Top Layer w0.2: v1(63.754,28.829) 65.071,29.499 65.497,29.925 65.599,30.713 65.732,31.031 cw(c65.926,30.984) 65.787,31.128 ccw(c64.646,32.286) 65.795,31.136 65.858,31.199 cw(c66,31.058) 66,31.258 IC2.34
  Bottom Layer w0.2: v1(63.754,28.829) 61.937,27.012 61.937,24.98 60.325,23.368 60.325,11.237 60.442,11.12 60.544,11.12 ccw(c26.586,193.089) 68.332,12.747 cw(c68.376,12.552) 68.555,12.64 ccw(c69.469,13.081) 70.483,13.099 cw(c70.683,13.102) 70.635,13.296 ccw(c26.586,193.089) 70.944,13.372 ccw(c70.895,13.566) 71.079,13.486 cw(c72.009,13.081) 72.637,13.878 ccw(c72.759,14.036) 72.808,13.842 ccw(c26.586,193.089) 72.816,13.844 cw(c72.865,13.65) 73.049,13.728 ccw(c74.549,14.351) 73.471,13.136 cw(c73.338,12.987) 73.538,13.003 ccw(c74.549,13.081) 74.917,14.026 cw(c74.991,14.212) 74.938,14.405 ccw(c26.586,193.089) 82.114,16.503 ccw(c82.053,16.694) 82.165,16.86 cw(c82.645,17.576) 83.451,17.27 ccw(c83.638,17.2) 83.699,17.009 ccw(c26.586,193.089) 89.993,19.177 90.029,19.177 92.978,19.177 cw(c92.978,18.977) 93.063,19.158 ccw(c93.508,20.09) 93.257,19.088 ccw(c93.345,19.431) 93.261,19.087 ccw(c93.345,19.431) 93.263,19.087 cw(c92.779,17.085) 94.4,18.354 cw(c93.27,17.471) 94.705,17.466 ccw(c95.059,17.463) 94.705,17.464 ccw(c95.885,17.463) 95.016,16.665 95.717,15.901 ccw(c96.52,16.637) 95.752,17.409 cw(c95.611,17.552) 95.411,17.544 ccw(c93.27,17.471) 94.956,18.793 ccw(c92.779,17.085) 94.91,18.85 cw(c95.065,18.977) 95.065,19.177 H2.4
SYS_SWO: H2.6
USB_D_N: D5.2 IC2.32 J1.8 J1.10 | length 63.3
  Top Layer w0.25: v2(62.865,31.877) cw(c63.014,31.728) 63.014,31.939 63.315,31.939 ccw(c63.315,32.484) 63.701,32.098 cw(c64.086,31.713) 64.086,32.258 IC2.32 ; J1.8 88.265,21.187 ccw(c89.132,21.187) 88.519,20.574 88.668,20.574 ccw(c88.668,21.441) 89.281,20.828 J1.10 ; J1.10@89.256,21.864 89.306,22.049 89.396,22.382 cw(c89.639,22.317) 89.415,22.433 89.699,22.978 89.796,23.143 89.796,24.631 v2(89.789,24.638)
  Top Layer w0.381: v2(94.234,24.13) 94.234,24.271 96.887,26.924 D5.2
  Bottom Layer w0.25: v2(62.865,31.877) cw(c63.014,31.728) 63.014,31.939 63.327,31.939 ccw(c63.327,32.455) 63.692,32.09 cw(c63.891,31.891) 63.891,32.172 ccw(c63.891,32.453) 64.089,32.254 64.695,32.86 64.695,35.111 ccw(c64.445,35.11) 64.591,35.313 cw(c65.399,36.445) 64.591,37.577 ccw(c64.445,37.78) 64.695,37.778 64.695,38.084 cw(c69.024,38.084) 65.963,41.146 66.124,41.307 ccw(c65.947,41.483) 66.185,41.408 ; 66.185,41.408 cw(c66.665,41.254) 66.665,41.758 71.459,41.758 cw(c71.459,35.158) 76.124,39.827 76.549,39.402 76.581,39.37 cw(c76.225,39.014) 76.692,39.202 76.709,39.16 78.276,35.281 78.958,34.598 ; 78.959,34.597 ccw(c79.136,34.774) 79.238,34.545 cw(c79.756,33.401) 80.945,32.997 ccw(c81.182,32.918) 80.951,32.822 81.011,32.678 cw(c80.315,32.389) 81.013,32.673 cw(c80.196,32.339) 81.029,32.632 88.788,24.769 ccw(c89.446,25.427) 89.446,24.496 ccw(c89.446,24.981) v2(89.789,24.638) 89.813,24.638 90.565,23.887 92.14,23.887 92.383,24.13 v2(94.234,24.13)
USB_D_P: D6.2 IC2.33 J1.7 J1.9 | length 60.4
  Top Layer w0.25: v2(63.5,30.607) ccw(c63.307,30.8) 63.58,30.8 63.58,30.919 cw(c64.415,30.919) 63.824,31.509 ; 63.824,31.509 cw(c64.415,30.919) 64.415,31.754 67.212,31.754 IC2.33 ; D6.2 86.481,30.99 cw(c82.085,26.84) 86.962,30.413 cw(c86.76,30.266) 87.01,30.267 87.01,28.891 ccw(c87.262,28.891) 87.262,28.639 87.671,28.639 cw(c87.67,28.389) 87.911,28.457 cw(c82.085,26.84) 88.131,26.84 v2(88.131,23.6) ; J1.7 87.757,23.024 88.131,23.397 v2(88.131,23.6) ; J1.9 88.773,22.958 v2(88.131,23.6)
  Bottom Layer w0.25: v2(63.5,30.607) ccw(c63.307,30.8) 63.58,30.8 63.58,30.976 cw(c64.277,30.976) 63.784,31.469 63.901,31.586 cw(c64.099,31.387) 64.099,31.668 ccw(c64.099,31.949) 64.298,31.75 65.051,32.503 ccw(c64.695,32.86) 65.199,32.86 65.199,35.112 ccw(c64.445,35.11) 64.885,35.722 cw(c65.399,36.445) 64.884,37.167 ccw(c64.445,37.78) 65.199,37.778 65.199,38.588 cw(c67.807,38.588) 65.963,40.433 66.481,40.951 ccw(c65.947,41.483) 66.665,41.253 ccw(c66.425,41.33) 66.665,41.254 71.459,41.254 cw(c71.459,35.158) 75.769,39.469 76.225,39.014 ccw(c82.006,39.014) 77.918,34.926 78.602,34.242 ccw(c79.136,34.774) 79.446,34.086 cw(c79.756,33.401) 80.468,33.159 ccw(c81.182,32.918) 80.475,32.657 80.564,32.342 80.589,32.254 81.185,30.608 81.307,30.424 84.487,27.244 84.531,27.244 85.001,26.774 85.001,26.73 v2(88.131,23.6)
V_EH: C1.1 H3.2 IC1.1 R1.1 | length 24.4
  Top Layer w0.254: R1.1 ccw(c58.552,39.424) 58.479,39.424 C1.1 ccw(c58.479,32.453) 58.039,32.453 H3.2 58.039,17.735 ccw(c59.518,17.735) IC1.1
V_MCU: C3.1 C4.1 C5.1 C6.1 C7.1 C8.1 D7.1 D8.1 H1.1 IC1.8 IC2.1 IC2.9 IC2.24 IC2.48 R2.1 R3.1 R4.1 R10.1 | length 111.6
  Top Layer w0.254: D8.1 62.865,20.705 62.865,18.029 62.865,17.924 62.939,17.849 62.943,17.845 ccw(c64.669,19.725) 63.79,17.329 cw(c63.702,17.091) 63.905,17.243 cw(c63.005,16.57) 64.126,16.653 64.191,16.588 64.227,16.552 64.464,16.454 64.888,16.278 IC1.8@64.91,16.269 ; R3.1 64.262,42.164 C3.1 R4.1 66.548,39.402 ccw(c68.704,39.402) 66.643,38.77 cw(c66.408,38.673) 66.656,38.729 ccw(c68.704,39.402) 68.681,37.246 IC2.24 68.727,37.001 68.803,36.473 ccw(c69.054,36.508) 69,36.26 69.422,36.168 ccw(c69.476,36.416) 69.476,36.162 76.43,36.162 cw(c76.43,35.908) 76.451,36.161 77.414,36.083 77.416,36.083 C4.1 ; v1(64.897,17.526) 64.897,16.301 ccw(c64.942,16.301) IC1.8@64.91,16.269 ; 74.32,32.2 ccw(c74.954,32.206) 74.32,32.199 ccw(c74.701,32.204) 74.382,31.994 74.659,31.574 cw(c74.446,31.434) 74.7,31.437 74.7,30.503 74.849,30.354 75.09,30.218 ccw(c75.862,31.414) 75.803,29.992 77.664,29.915 cw(c77.655,29.661) 77.665,29.915 77.765,29.911 77.835,29.841 77.909,29.766 77.909,28.002 cw(c77.655,28.002) 77.655,27.748 76.655,27.748 cw(c76.655,28.002) 76.401,28.002 76.401,28.435 ccw(c76.147,28.435) 76.158,28.689 74.227,28.769 IC2.48 74.831,28.52 74.88,28.5 74.991,28.389 74.991,28.179 74.811,27.998 74.811,27.374 75.253,26.932 75.586,26.932 75.66,26.858 75.674,26.844 75.948,26.422 ; 74.32,32.201 cw(c74.954,32.206) 74.319,32.206 74.319,32.408 cw(c74.954,32.408) 74.569,32.912 74.601,32.937 ccw(c74.446,33.139) 74.7,33.136 ; 74.7,33.138 74.7,33.608 74.7,33.908 cw(c74.954,33.908) 74.924,34.16 75.511,34.235 IC2.9 ; R2.1@75.438,25.4 75.438,21.507 75.832,21.113 75.832,16.904 H1.1 ccw(c75.438,15.621) 75.438,14.732 C8.1 ccw(c78.613,14.795) C8.1@78.645,14.741 ; R2.1 75.788,25.973 75.948,26.372 75.948,26.421 ; IC2.9@75.907,34.281 76.463,34.356 ccw(c76.43,34.608) 76.683,34.608 76.683,35.652 cw(c76.938,35.654) 76.82,35.879 cw(c77.597,34.378) 77.414,36.058 C4.1 ; D7.1 78.676,14.795 cw(c78.613,14.795) C8.1@78.645,14.741 ; v1(82.169,15.617) 81.507,15.099 C7.1 78.676,14.741 C8.1@78.645,14.741 ; v1(86.741,12.954) ccw(c87.503,12.954) 87.503,12.192 C6.1 ccw(c90.796,12.192) 90.796,9.906 C5.1 ; R10.1 ccw(c86.614,35.052) 86.614,36.068 C4.1 ; IC1.8@64.91,16.269 ccw(c64.942,16.301) IC1.8 IC1.8@64.91,16.269
  Bottom Layer w0.254: v1(64.897,17.526) 72.644,17.526 ccw(c72.644,17.78) 72.74,17.545 73.502,17.854 73.612,17.965 73.66,18.529 73.929,18.798 cw(c74.108,18.618) 74.207,18.852 74.289,18.817 ccw(c76.394,23.773) 75.135,18.538 75.243,18.512 cw(c75.184,18.265) 75.438,18.267 ; H1.1 75.21,16.282 75.438,17.793 75.438,18.266 ; v1(82.169,15.617) 82.383,14.473 ccw(c84.709,15.494) 84.709,12.954 v1(86.741,12.954)
V_USB: C10.1 D4.2 J1.4 J1.13 U1.1 U1.3 | length 57.3
  Top Layer w0.254: D4.2 85.471,11.303 ccw(c84.709,11.303) C10.1 cw(c84.709,12.787) 83.987,12.787 U1.3 84.279,14.656 84.716,14.914 ccw(c84.587,15.133) 84.798,14.991 85.525,16.075 ccw(c84.998,16.429) 85.633,16.429 85.633,16.488 85.633,16.683 cw(c85.887,16.683) 85.887,16.937 87.087,16.937 cw(c87.087,16.683) 87.114,16.936 ccw(c87.152,17.315) 87.117,16.935 ccw(c87.188,17.694) 87.188,16.932 ccw(c87.188,17.694) 87.814,17.259 ccw(c87.501,17.477) 87.815,17.261 cw(c88.025,17.118) 88.025,17.372 89.1,17.372 89.249,17.223 ccw(c89.502,17.245) 89.292,17.102 89.375,16.979 89.431,16.885 89.431,15.543 89.58,15.394 89.58,15.055 90.17,14.465 90.17,13.729 89.649,13.208 89.607,13.208 89.431,13.032 89.431,11.352 89.58,11.203 90.76,11.203 90.909,11.352 90.909,11.625 91.058,11.774 91.189,11.774 cw(c90.814,9.906) 92.352,11.031 cw(c92.146,10.881) 92.361,10.746 92.361,9.066 92.51,8.917 93.69,8.917 93.839,9.066 93.839,10.746 93.69,10.895 93.352,10.895 93.278,10.969 93.246,11.002 ccw(c90.814,9.906) 91.126,12.555 91.065,12.615 90.977,12.704 90.977,12.786 90.977,15.475 90.909,15.543 90.909,17.223 90.76,17.372 cw(c90.78,17.625) 90.665,17.399 90.663,17.4 89.637,17.93 89.602,17.948 89.416,18.134 88.025,18.134 ccw(c88.025,17.118) 87.822,18.114 85.685,17.679 ccw(c85.887,16.683) 85.106,17.333 84.46,16.556 U1.1 83.918,18.116 83.918,18.121 83.918,18.198 85.516,20.768 85.611,20.863 85.749,20.863 85.898,21.012 85.898,21.383 85.933,21.439 J1.4 86.181,21.642 86.181,20.885 87.508,19.558 90.297,19.558 90.932,20.193 ccw(c90.678,20.193) v1@90.878,20.35 ; v1@90.932,20.393 v1(90.932,20.42) J1.13
XIN: C13.1 IC2.5 Y1.3 | length 17.7
  Top Layer w0.254: Y1.3 71.423,22.461 ccw(c70.643,22.461) C13.1 70.816,23.424 v2(71.636,23.459) ; IC2.5 77.29,32.258 cw(c77.29,31.824) v2(77.597,32.131)
  Bottom Layer w0.254: v2(71.636,23.459) 71.642,23.465 74.243,23.465 75.057,24.279 77.597,26.819 77.597,31.537 v2(77.597,32.131)
XOUT: C14.2 IC2.6 Y1.1 | length 27.6
  Top Layer w0.254: Y1.1 70.231,19.812 v2(70.231,18.796) ; v2@70.231,18.415 v2(70.231,18.796) ; C14.2 cw(c71.343,18.879) 70.746,18.281 v2(70.231,18.796) ; IC2.6 76.303,32.781 v2(79.756,33.401)
  Bottom Layer w0.254: v2(70.231,18.796) 70.952,18.796 ccw(c70.952,23.8) 74.491,20.262 78.613,24.384 78.613,28.303 cw(c84.169,28.303) 80.127,32.115 80.156,32.182 80.156,32.34 v2(79.756,33.401)
pads on no net: IC2.2 IC2.3 IC2.4 IC2.10 IC2.11 IC2.12 IC2.13 IC2.14 IC2.15 IC2.16 IC2.17 IC2.18 IC2.19 IC2.20 IC2.21 IC2.22 IC2.25 IC2.26 IC2.27 IC2.28 IC2.29 IC2.30 IC2.31 IC2.39 J1.6 J1.12 R8.2 U1.4
copper on no net: | length 0
  other v3: 50.183,16.238 54.683,16.238

## Silkscreen, mask and mechanical layers (free items; w line width, h text height)
Top Overlay:
  text "Kyle G Gayliyev / SEPTEMBER 2026 / UECE" at 57.31,50.643 h1.8
  text "NFC TAG" at 107.781,40.687 h4.5 r90
Bottom Overlay:
  region: 9215 vertices and 0 holes, not listed, extent 74.136,29.013 104.692,56.775